# Altium PCB BuckConverter.PcbDoc
Units mm, origin at the board's own origin, x right, y up, seen from the top; angles counter-clockwise.
Board outline 30 x 30 mm, 2 copper layers (Top (signal), Bottom (GND)), stack 1.571 mm thick; 13 components, 6 nets, 34 pads, 9 vias.
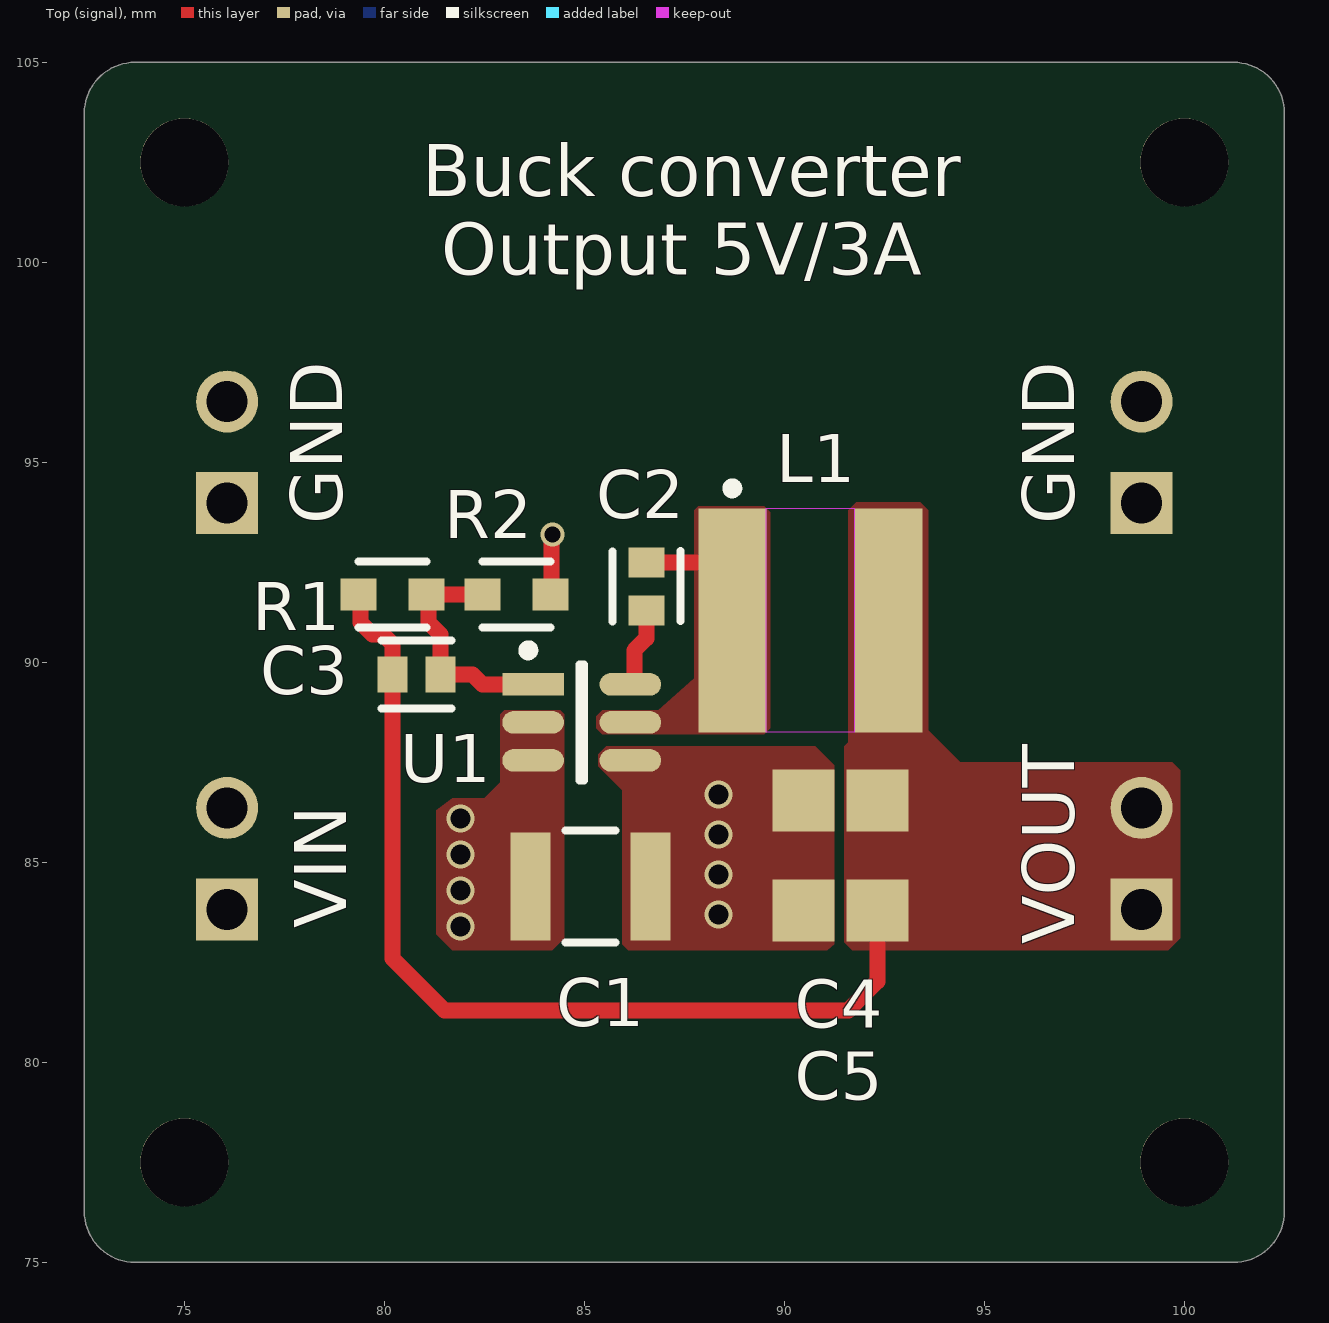
[diagram p0: Top (signal) view]
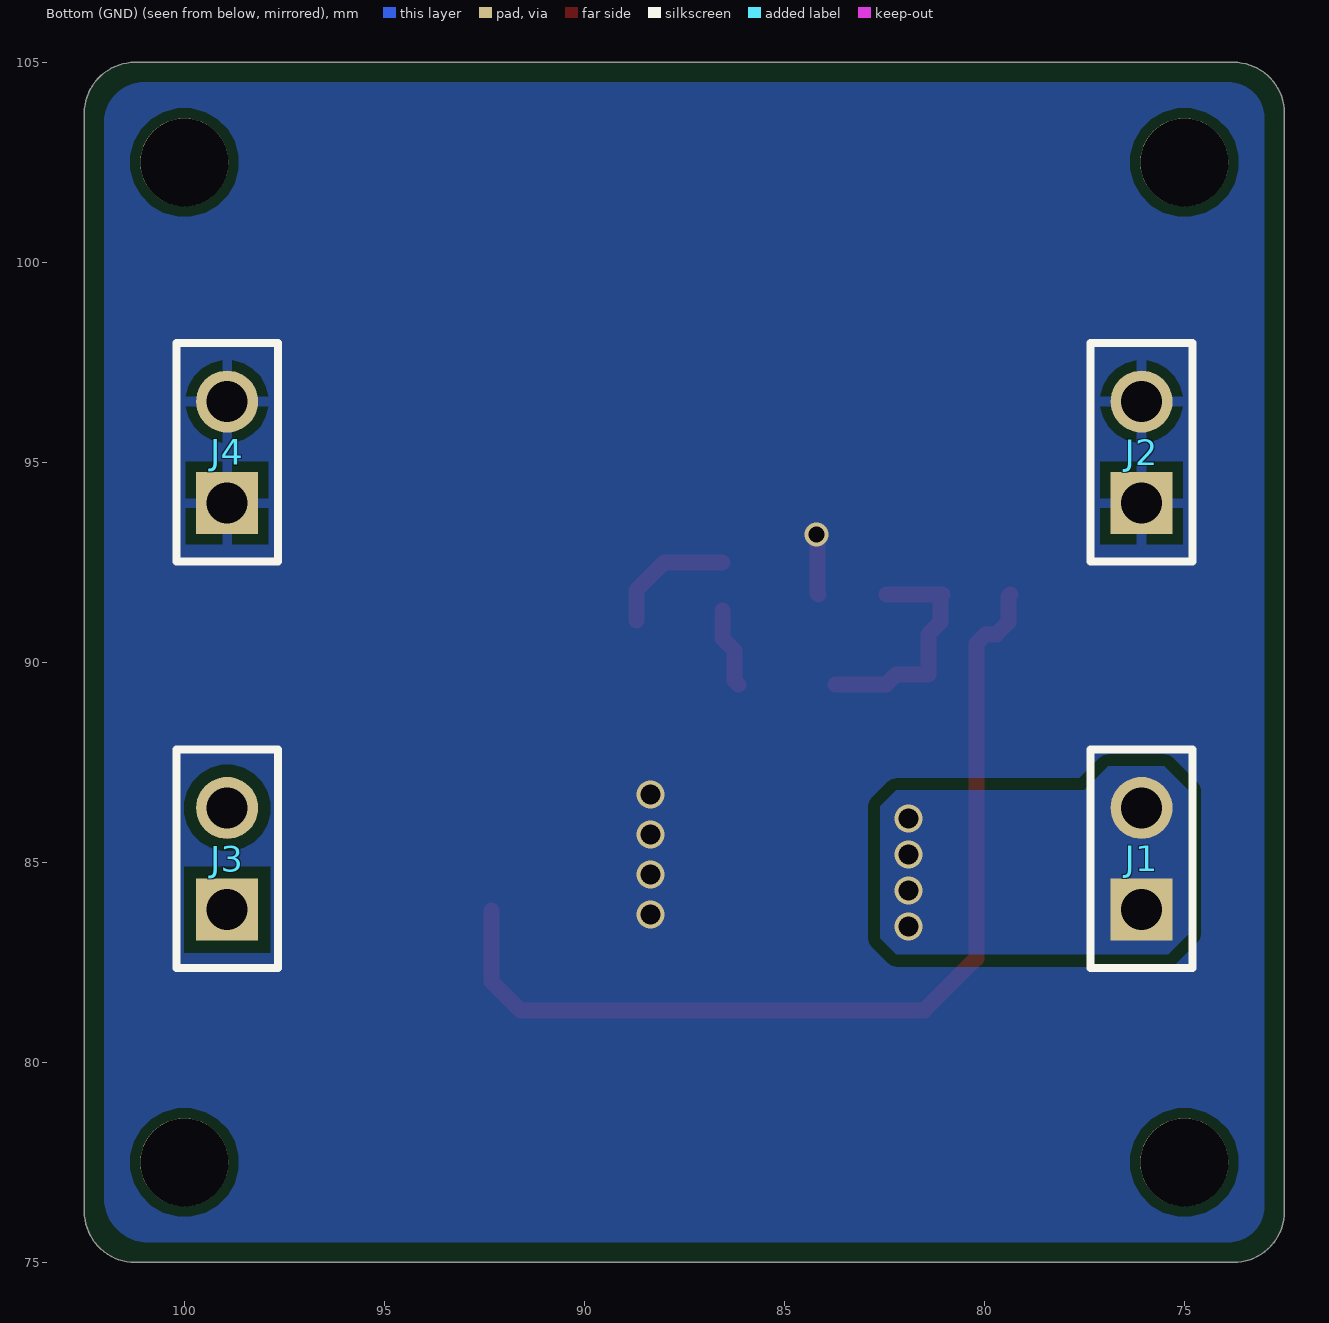
[diagram p1: Bottom (GND) view, seen from below]
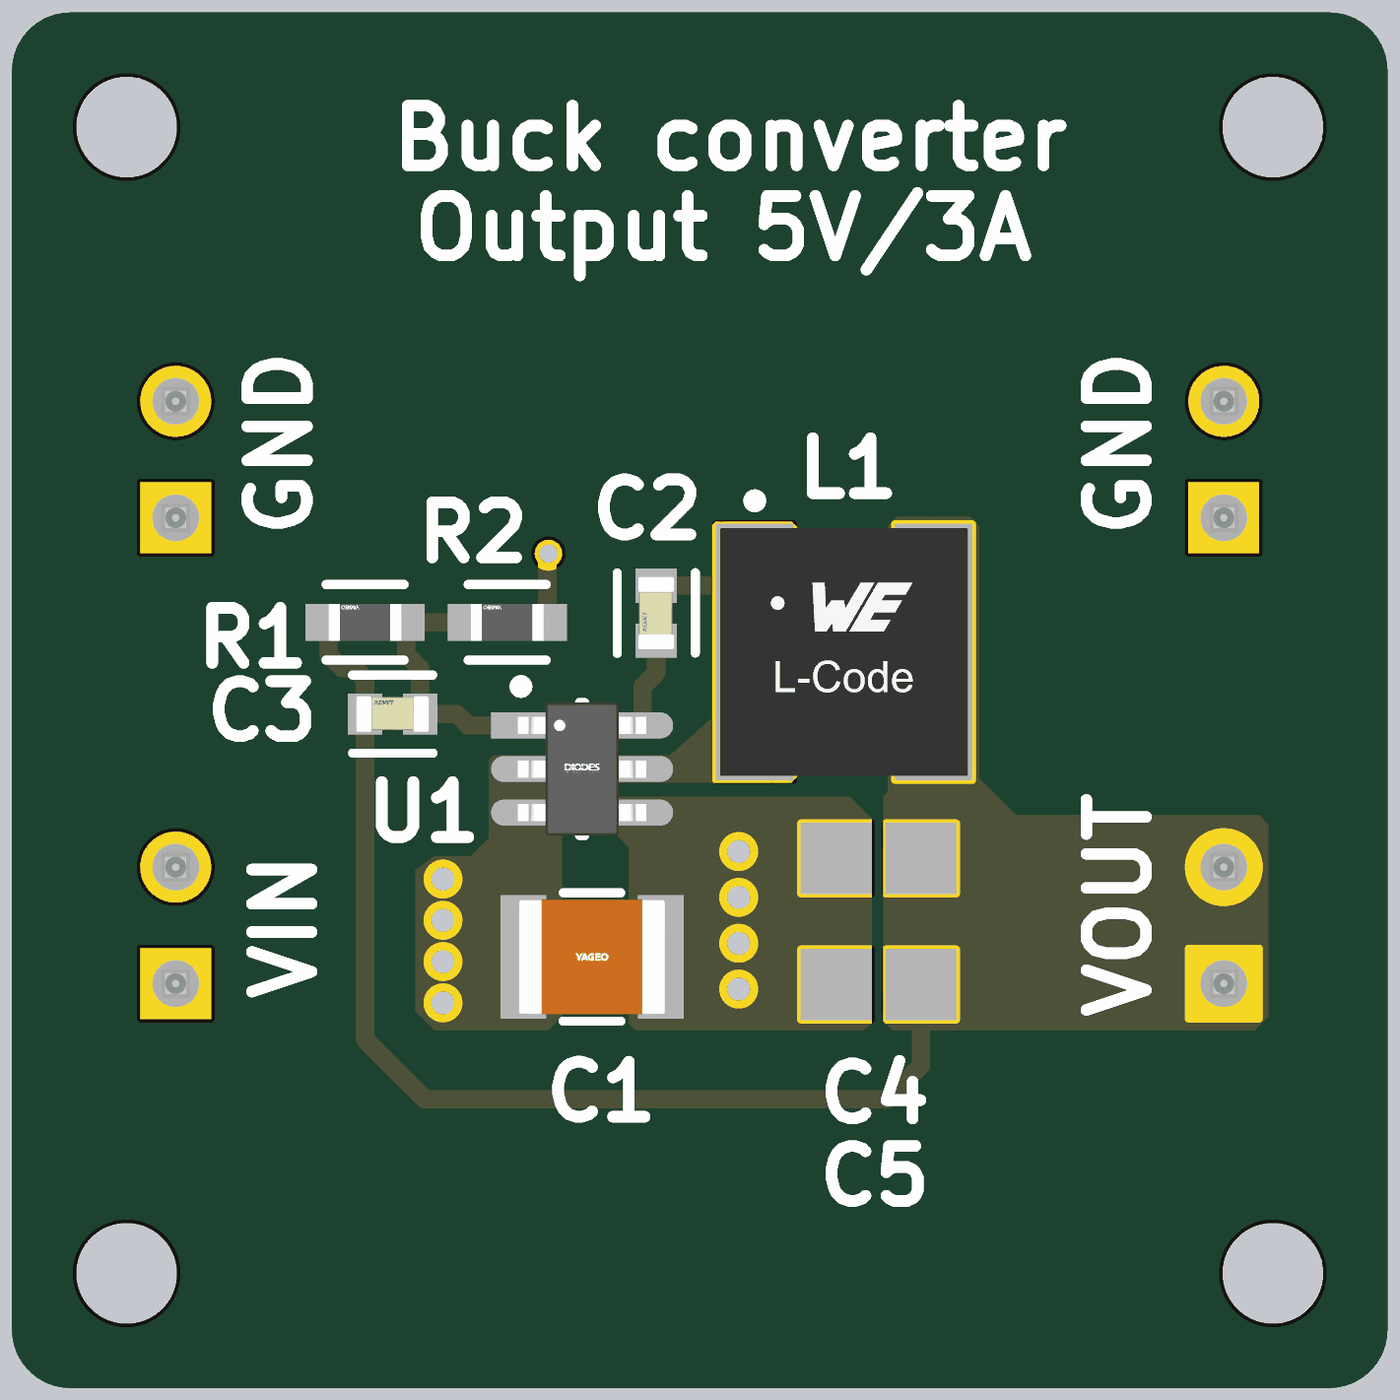
[diagram p2: 3D render of the assembled board from above, using the file's embedded part models]
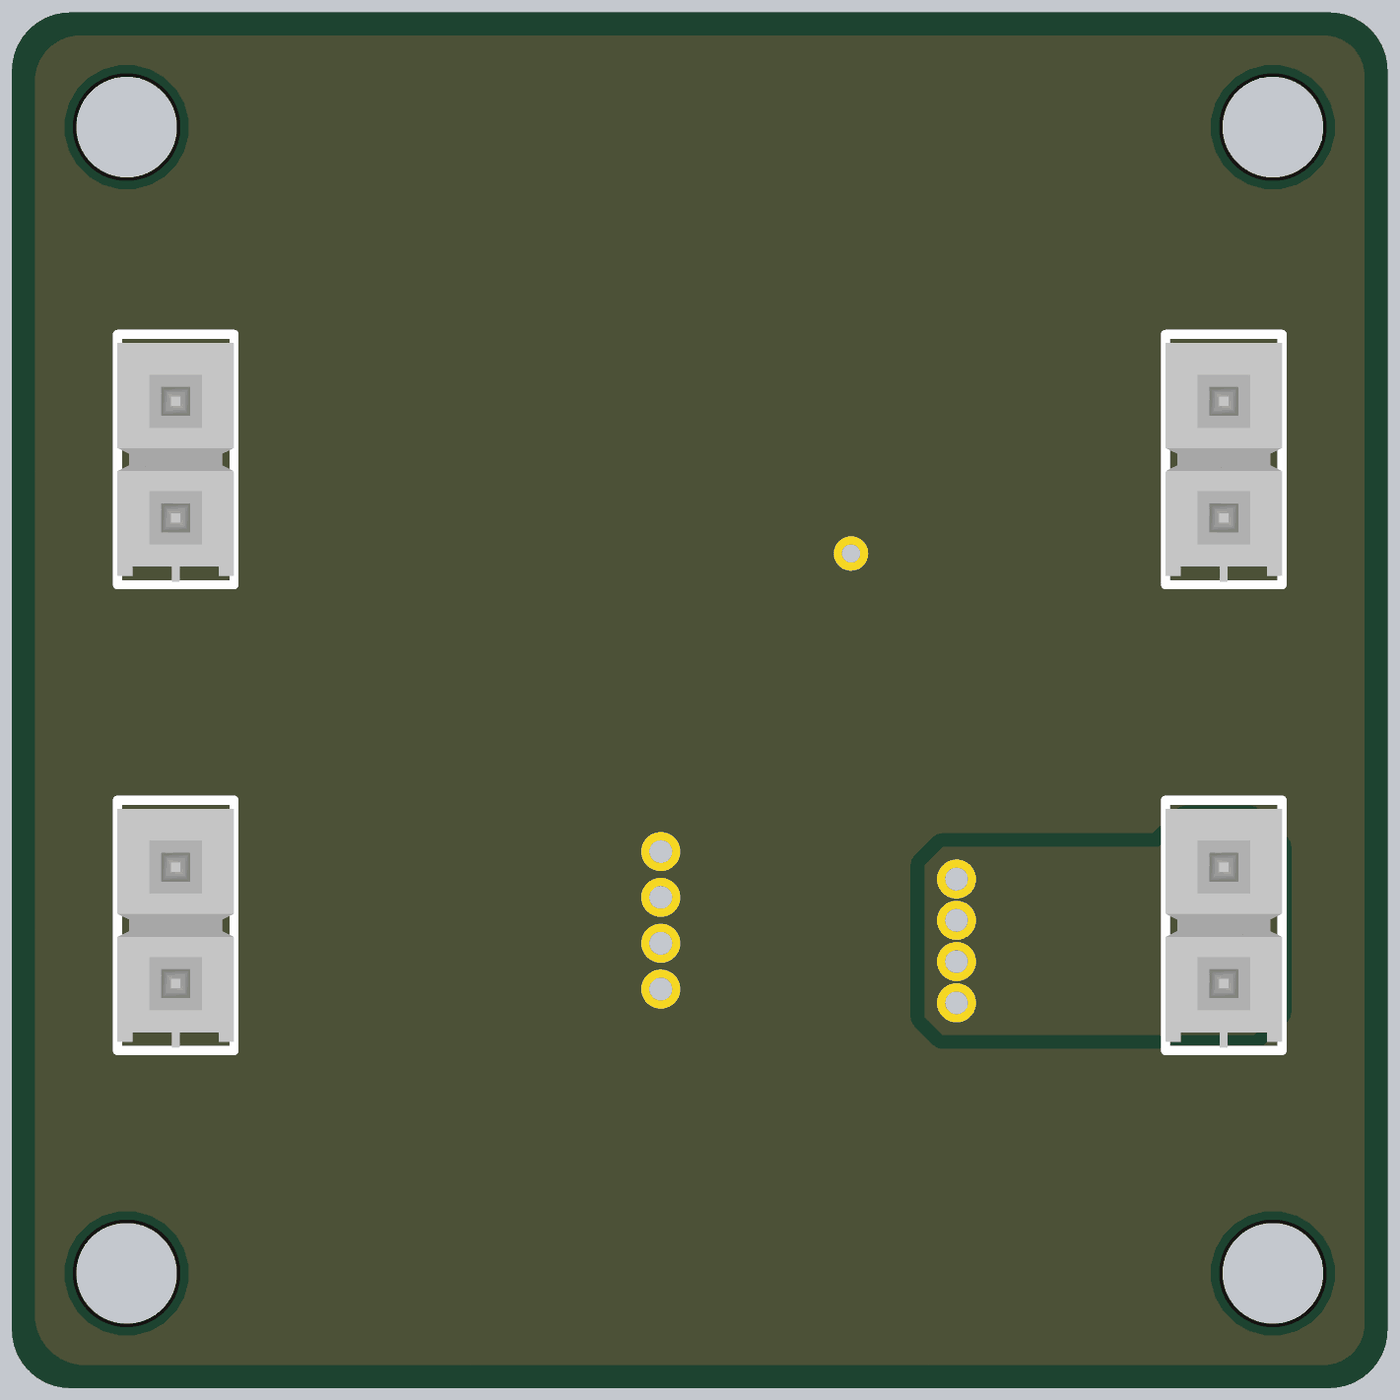
[diagram p3: 3D render of the assembled board from below, using the file's embedded part models]

## Layer stack, top to bottom
Top Solder: solder mask 0.0102, Solder Resist, Dk 3.5
Top (signal): signal copper 0.0356
Dielectric 1: dielectric 1.5, FR-4, Dk 4.8
Bottom (GND): signal copper 0.0356
Bottom Solder: solder mask 0.0102, Solder Resist, Dk 3.5

## Board outline
73.77,75 cw(c73.77,76.27) 72.5,76.27 72.5,103.73 cw(c73.77,103.73) 73.77,105 101.23,105 cw(c101.23,103.73) 102.5,103.73 102.5,76.27 cw(c101.23,76.27) 101.23,75

## Design rules (kind name [scope] priority, off if disabled: settings)
BoardOutlineClearance [All] p1: gap=0.2 ignorepadtopadclearanceinfootprint=FALSE
Clearance Clearance24V [InNet('24V')] p1: gap=0.127 ignorepadtopadclearanceinfootprint=FALSE except(0.25: Arc-Hole Track-Hole SMDPad-Hole THPad-Hole Via-Hole Fill-Hole Poly-Hole Region-Hole Text-Hole; 0.3: Poly-Poly)
Clearance [All] p2: gap=0.127 ignorepadtopadclearanceinfootprint=FALSE except(0.25: Arc-Hole Track-Hole SMDPad-Hole THPad-Hole Via-Hole Fill-Hole Poly-Hole Region-Hole Text-Hole; 0.3: THPad-Poly)
ComponentClearance [All] p1: gap=0.127 collisioncheckmode=3 verticalgap=0.127 showdistances=TRUE
DiffPairsRouting [All] p1: maxlimit=0.254 minlimit=0.127 mostfreqgap=0.127 toplayer_minwidth=0.127 toplayer_maxwidth=25.4 toplayer_prefwidth=0.127 bottomlayer_minwidth=0.127 bottomlayer_maxwidth=25.4 bottomlayer_prefwidth=0.127 maxuncoupledlength=12.7
Height [All] p1: minheight=0 maxheight=1816.048 prefheight=12.7
HoleSize [All] p1: absolutevalues=TRUE maxlimit=6.3 minlimit=0.3 maxpercent=80.000 minpercent=20.000
HoleToHoleClearance [All] p1: gap=0.25 allowstackedmicrovias=FALSE
MinimumAnnularRing [All] p1: minimumring=0.076
MinimumSolderMaskSliver [All] p1: minsoldermaskwidth=0
PlaneClearance [All] p1: clearance=0.3
PlaneConnect PlaneConnectPowerPads [InPadClass('PowerPads')] p1: planeconnectstyle=Direct reliefexpansion=0.508 reliefentries=4 reliefconductorwidth=0.254 reliefairgap=0.254
PlaneConnect [All] p2: pad.planeconnectstyle=Relief pad.reliefexpansion=0.3 pad.reliefentries=4 pad.reliefconductorwidth=0.127 pad.reliefairgap=0.127 via.planeconnectstyle=Direct via.reliefexpansion=0.3 via.reliefentries=4 via.reliefconductorwidth=0.127 via.reliefairgap=0.127
PolygonConnect PolygonGND [InNet('GND') vs HasFootprint('SMTC-TSW-102-26-XX-S')] p1: thpad.connectstyle=Relief thpad.reliefconductorwidth=0.254 thpad.reliefentries=4 thpad.polygonreliefangle="90 Angle" thpad.airgapwidth=0.254 smdpad.connectstyle=Direct smdpad.reliefconductorwidth=0.254 smdpad.reliefentries=4 smdpad.polygonreliefangle="90 Angle" smdpad.airgapwidth=0.254 via.connectstyle=Relief via.reliefconductorwidth=0.254 via.reliefentries=4 via.polygonreliefangle="90 Angle" via.airgapwidth=0.254
PolygonConnect PolygonConnectPowerPads [All vs (InPadClass('PowerPads'))] p2: connectstyle=Direct reliefconductorwidth=0.254 reliefentries=4 polygonreliefangle="90 Angle" airgapwidth=0.254
PolygonConnect [All] p3: connectstyle=Direct reliefconductorwidth=0.4 reliefentries=4 polygonreliefangle="90 Angle" airgapwidth=0.127
RoutingVias [All] p1: holewidth=0.3 width=0.6 viastyle="Through Hole" minholewidth=0.3 minwidth=0.6 maxholewidth=0.6 maxwidth=6.6
SilkToSilkClearance [All] p1: silktosilkclearance=0
SilkToSolderMaskClearance [IsPad] p1: minsilkscreentomaskgap=0.127 clearancetoexposedcopper=TRUE
SolderMaskExpansion [All] p1: expansion=0.075 istentingtop=FALSE
SupplyNets "Schematic Supply Nets_2" [InNet('GND')] p1: voltage=0.000
SupplyNets "Schematic Supply Nets_1" [InNet('5V')] p2: voltage=0.000
SupplyNets "Schematic Supply Nets" [InNet('24V')] p3: voltage=0.000
Width [All] p1: maxlimit=25.4 minlimit=0.127 preferedwidth=0.127 minimp=50.000000 maximp=50.000000 favimp=50.000000
20 further rules are at their usual default settings.

## Components (designator, comment, footprint, x,y, rotation, side; value= is the part's Value field where it differs from the comment)
C1 "10u" FP-CC1210-GD-MFG 85.15,84.4 r0 top
C2 "100n" FP-C0603C-CF-MFG 86.55,91.9 r90 top value="0.10 μF"
C3 "47p" FP-C0603C-CF-MFG 80.8,89.7 r0 top value="47 pF"
C4 "22u" CAPC2013X152X50ML20T25 91.4,86.55 r0 top
C5 "22u" CAPC2013X152X50ML20T25 91.4,83.8 r0 top
J1 "IN+" SMTC-TSW-102-26-XX-S 76.07,83.82 r90 bottom locked
J2 "IN-" SMTC-TSW-102-26-XX-S 76.07,93.98 r90 bottom locked
J3 "OUT+" SMTC-TSW-102-26-XX-S 98.93,83.82 r90 bottom locked
J4 "OUT-" SMTC-TSW-102-26-XX-S 98.93,93.98 r90 bottom locked
L1 "6u8" WE-MXGI_5030 90.65,91.05 r0 top
R1 "158k" FP-AC0603-MFG 80.2,91.7 r180 top
R2 "30k1" FP-AC0603-MFG 83.3,91.7 r180 top
U1 "AP63300WU-7" FP-TSOT26-IPC_A 84.935,88.5 r0 top

## Footprints (in the part's own frame and the unit in brackets; to place one, negate y for a bottom-side part, rotate by r counter-clockwise, add the part's x,y. Pads: shape width x height; smd on the part's side, far side on the other; paste and mask are expansions set on the pad)
CAPC2013X152X50ML20T25 [mm] "Chip Capacitor, 2-Leads, Body 2.01x1.25mm, IPC Low Density"
  rect 1.55x1.55 smd: 1(-0.925,0) 2(0.925,0)
  body extent -1.1,-0.72 1.11,0.72, height 1.52
FP-AC0603-MFG [mm]
  rect 0.9x0.8 smd paste+0 mask+0: 1(-0.85,0) 2(0.85,0)
  silkscreen extent -0.85,-0.82 0.85,0.82, body extent -1.4,-0.55 1.4,0.55, height 0.25
FP-C0603C-CF-MFG [mm]
  rect 0.75x0.9 smd paste+0 mask+0: 1(-0.6,0) 2(0.6,0)
  silkscreen extent -0.87,-0.85 0.88,0.85, body extent -1.2,-0.6 1.2,0.6, height 0.25
FP-CC1210-GD-MFG [mm]
  rect 1x2.7 smd paste+0 mask+0: 1(-1.5,0) 2(1.5,0)
  silkscreen extent -0.63,-1.4 0.63,1.4, body extent -2.32,-1.83 2.32,1.83, height 0.25
FP-TSOT26-IPC_A [mm]
  rect 1.54x0.566 smd paste+0 mask+0: 1(-1.216,0.95)
  rrect100% 1.54x0.566 smd paste+0 mask+0: 2(-1.216,0) 3(-1.216,-0.95) 4(1.216,-0.95) 5(1.216,0) 6(1.216,0.95)
  silkscreen extent -1.46,-1.45 0.05,1.92, body extent -2.49,-1.95 2.49,1.95, height 0.25
SMTC-TSW-102-26-XX-S [mm] ".025 SQ Post Terminal Strip Assembly, 1x2 Pins, Vertical, 2.54mm Pitch, Male"
  rect 1.55x1.55 hole 1.02: 1(0,0)
  round 1.55 hole 1.02: 2(2.54,0)
  silkscreen extent -1.46,-1.27 4,1.27, body extent -1.4,-1.27 3.81,1.27, height 8.38
WE-MXGI_5030 [mm] "SMT Power Inductor, body 5.40 x 5.40 mm"
  rect 1.7x5.6 smd: 1(-1.95,0) 2(1.95,0)
  Top (signal) keep-out region: -1.1,2.8 1.1,2.8 1.1,-2.8 -1.1,-2.8
  silkscreen extent -2.07,3.18 -1.83,3.42, body extent -2.7,-2.7 2.7,2.7, height 3.1

## Part data
C1: library part CMP-03422-001447-1, "CAP CER 10UF 50V X7R 1210", Capacitance=10uF, Case Code (Imperial)=1210, Case Code (Metric)=3225, Max Operating Temperature=125°C, Min Operating Temperature=-55°C, Tolerance=20%, Voltage Rating=50V, Case/Package=1210, Mount="Surface Mount", Packaging="Tape and Reel", RoHS Compliant=Yes
C2: library part CMP-2006-03056-2, "CAP CER 0.1UF 50V 5% X7R 0603", Capacitance="0.10 μF", Manufacturer=KEMET, Manufacturer Part Number=C0603C104J5RACTU, Package=C0603C-CF, Temperature="-55°C to +125°C", Temperature Characteristic=X7R, Temperature Coefficient=30ppm/°C, Temperature Range High=+125°C, Temperature Range Low=-55°C, Tolerance=0.05, Voltage Rating="50 V", Automotive=Yes, Automotive Grade="Grade 1", Category=Cap, ComponentLink2Description=Datasheet, ComponentLink2URL=https://api.kemet.com/component-edge/download/datasheet/C0603C100J5GACAUTO.pdf, Device Class L1="Passive Components", Device Class L2=Capacitors, Device Class L3="Ceramic Capacitors", Digikey Description="CAP CER 0.1UF 50V 5% X7R 0603", Height=0.87mm, Lead Free=Yes, Material=Ceramic, Mouser Description="Multilayer Ceramic Capacitors MLCC - SMD/SMT 50volts 0.1uF X7R 5%", Octopart=https://octopart.com/c0603c104j5ractu-kemet-10440638, RoHS=TRUE
C3: library part CMP-03020-009961-1, "C0603 47 pF X8R 30ppm/°C 10.00% 50 V", Capacitance="47 pF", Manufacturer=KEMET, Manufacturer Part Number=C0603C470K5HACAUTO, Package=C0603C-CF, Temperature="-55°C to +125°C", Temperature Characteristic=X8R, Temperature Coefficient=30ppm/°C, Temperature Range High=+125°C, Temperature Range Low=-55°C, Tolerance=0.1, Voltage Rating="50 V", Automotive=Yes, Automotive Grade="Grade 1", Category=Cap, ComponentLink2Description=Datasheet, ComponentLink2URL=https://api.kemet.com/component-edge/download/datasheet/C0603C100J5GACAUTO.pdf, Device Class L1="Passive Components", Device Class L2=Capacitors, Device Class L3="Ceramic Capacitors", Height=0.87mm, Lead Free=Yes, Material=Ceramic, Octopart=https://octopart.com/c0603c470k5hacauto-kemet-88089032, RoHS=TRUE
C4 C5: library part CMP-2007-04522-1, Manufacturer="AVX Interconnect / Elco", Part Number=0805ZD226MAT2A
J1 J2 J3 J4: library part CMP-1024-00329-1, "0.025\" SQ Post Header, Through-hole, Vertical, -55 to 125 degC, 2.54 mm Pitch, 2-Pin, Male, RoHS", Manufacturer=Samtec, PartNumber=TSW-102-26-F-S, Temperature Range="-55 to 125 degC", ComponentLink1Description="Manufacturer URL", ComponentLink1URL=http://www.samtec.com, ComponentLink2Description=Datasheet, ComponentLink2URL=http://www.samtec.com/documents/webfiles/pdf/TSW_TH.PDF, ComponentLink3Description="Package Specification", ComponentLink3URL=http://www.samtec.com/documents/webfiles/cpdf/TSW-XXX-XX-XXX-X-XX-XXX-MKT.pdf, DatasheetVersion=F-214, Mounting Technology=Through-hole, Orientation=Vertical, PackageDescription=".025[0.64] SQ. Post Terminal Strip Assembly", PackageReference=TSW-102-26-XX-S, PackageVersion="DM, 8/1988", Pitch="2.54 mm", RoHS=True
L1: library part CMP-03913-160330172-1, "SMD Pwr Ind, 6.8UH, 20%, 6.5A, Shielded Rohs Compliant: Yes"
R1: library part CMP-03412-016958-2, "RES 158KΩ 1.00% 0.1W 0603", Case/Package=0603, Max Operating Temperature=155°C, Max Power Dissipation=100mW, Min Operating Temperature=-55°C, Resistance=158kR, Resistor Type="Thick Film", Temperature Coefficient=100ppm/°C, Tolerance=1%, Features="Moisture Resistant", Height=0.022inch, Length=0.063inch, Number of Terminations=2, Packaging="Tape and Reel", RoHS Compliant=Yes, Series=AC, Width=0.031inch
R2: library part CMP-03412-014283-2, "RES 30.1KΩ 1.00% 0.1W 0603", Case Code (Imperial)=0603, Case Code (Metric)=1608, Max Operating Temperature=155°C, Max Power Dissipation=100mW, Min Operating Temperature=-55°C, Resistance=30.1kR, Resistor Type="Thick Film", Temperature Coefficient=100ppm/°C, Tolerance=1%, Voltage Rating=50V, Case/Package=0603, Features="Moisture Resistant", Height=0.022inch, Lead Free="Lead Free", Length=0.063inch, Number of Terminations=2, Packaging="Tape and Reel", Power Rating=100mW, RoHS Compliant=Yes, Series=AC, Termination=SMD/SMT, Width=0.8mm
U1: library part CMP-12757-000025-1, "DCDC CONV HV BUCK TSOT26"

## Free pads (board coordinates)
  round 2.2 hole 2.2 unplated: MH(75,77.5) MH(75,102.5) MH(100,77.5) MH(100,102.5)

## Via types
v1: diameter 0.7, hole 0.5, Top (signal) to Bottom (GND), 8 vias
v2: diameter 0.6, hole 0.4, Top (signal) to Bottom (GND), 1 vias

## Nets (pads, with @x,y where several pads share a name; then routed paths per layer and width w, separated by ;. In a path a pad name is that pad's centre, name@x,y a point inside that pad or via, vN(x,y) a via of type N, cw(c..) or ccw(c..) an arc to the next point about the centre after c; other vN are vias at no path point)
5V: C3.1 C4.2 C5.2 J3.1 J3.2 L1.2 R1.2 | length 24.3
  Top (signal) w0.4: R1.2 79.4,91.65 79.4,91 79.7,90.7 79.966,90.7 80.2,90.466 C3.1 80.2,82.6 81.5,81.3 91.6,81.3 92.325,82.025 C5.2
24V: C1.1 J1.1 J1.2 U1.2 U1.3
  other v1: 81.9,83.4 81.9,84.3 81.9,85.2 81.9,86.1
BUCK_BST: C2.1 U1.6 | length 2
  Top (signal) w0.4: U1.6 86.25,89.55 86.25,90.3 86.55,90.6 C2.1
BUCK_FB: C3.2 R1.1 R2.2 U1.1 | length 6
  Top (signal) w0.4: R2.2 R1.1 81.1,91.65 81.1,91 81.4,90.7 C3.2 82.2,89.7 82.45,89.45 U1.1
BUCK_SW: C2.2 L1.1 U1.5 | length 3.2
  Top (signal) w0.4: C2.2 88,92.5 88.7,91.8 L1.1
GND: C1.2 C4.1 C5.1 J2.1 J2.2 J4.1 J4.2 R2.1 U1.4 | length 1.5
  Top (signal) w0.4: R2.1 84.175,91.725 84.175,93.175 v2(84.2,93.2)
  other v1: 88.35,83.7 88.35,84.7 88.35,85.7 88.35,86.7

## Polygon pours and split planes (outlines as drawn)
24V on Top (signal) "24V_L01_P012" (solid, pour order 12): 84.2,82.8 81.7,82.8 81.3,83.2 81.3,86.3 81.7,86.6 82.5,86.6 82.9,87 82.9,88.7 83,88.8 84.4,88.8 84.5,88.7 84.5,83.1
5V on Top (signal) "5V_L01_P009" (solid, pour order 9): 91.5,83 91.7,82.8 99.6,82.8 99.9,83.1 99.9,87.3 99.7,87.5 94.4,87.5 93.6,88.3 93.6,93.8 93.4,94 91.8,94 91.6,93.8 91.6,88 91.5,87.9 91.5,87.6
BUCK_SW on Top (signal) "BUCK_SW_L01_P006" (solid, pour order 6): 89.5,88.2 89.65,88.35 89.65,93.75 89.5,93.9 87.85,93.9 87.75,93.8 87.75,89.6 86.85,88.8 85.45,88.8 85.3,88.65 85.3,88.35 85.45,88.2
GND on Top (signal) "GND_L01_P001" (solid, pour order 1): 85.95,82.95 86.1,82.8 91.075,82.8 91.25,82.95 91.25,87.425 90.775,87.9 87.25,87.9 85.55,87.9 85.35,87.7 85.35,87.4 85.55,87.2 85.95,86.8
GND on Bottom (GND) "GND_L02_P016" (solid, pour order 16): 101,104.5 cw(c101,103.5) 102,103.5 102,76.6 cw(c100.9,76.6) 100.9,75.5 73.9,75.5 cw(c73.9,76.4) 73,76.4 73,103.6 cw(c73.9,103.6) 73.9,104.5 76.8,104.5
24V on Bottom (GND) "24V_L02_P015" (solid, pour order 15): 74.9,83.2 75.4,82.7 82.2,82.7 82.6,83.1 82.6,86.4 82.2,86.8 77.5,86.8 76.9,87.4 75.5,87.4 74.9,86.8

## Silkscreen, mask and mechanical layers (free items; w line width, h text height)
Top Overlay:
  text "Buck converter" at 80.954,101.654 h1.3
  text "Output 5V/3A" at 81.422,99.687 h1.3
  text "GND" at 78.946,93.454 h1.3 r90
  text "GND" at 97.246,93.454 h1.3 r90
  text "VIN" at 79.046,83.354 h1.3 r90
  text "VOUT" at 97.246,82.954 h1.3 r90
Mechanical 1:
  the board outline again, w0.3